# Altium PCB ESP32-Custom_Module.PcbDoc
Units mm, origin at the board's own origin, x right, y up, seen from the top; angles counter-clockwise.
Board outline 49.53 x 47.37 mm, 2 copper layers (Top Layer, Bottom Layer); 22 components, 37 nets, 127 pads, 12 vias.
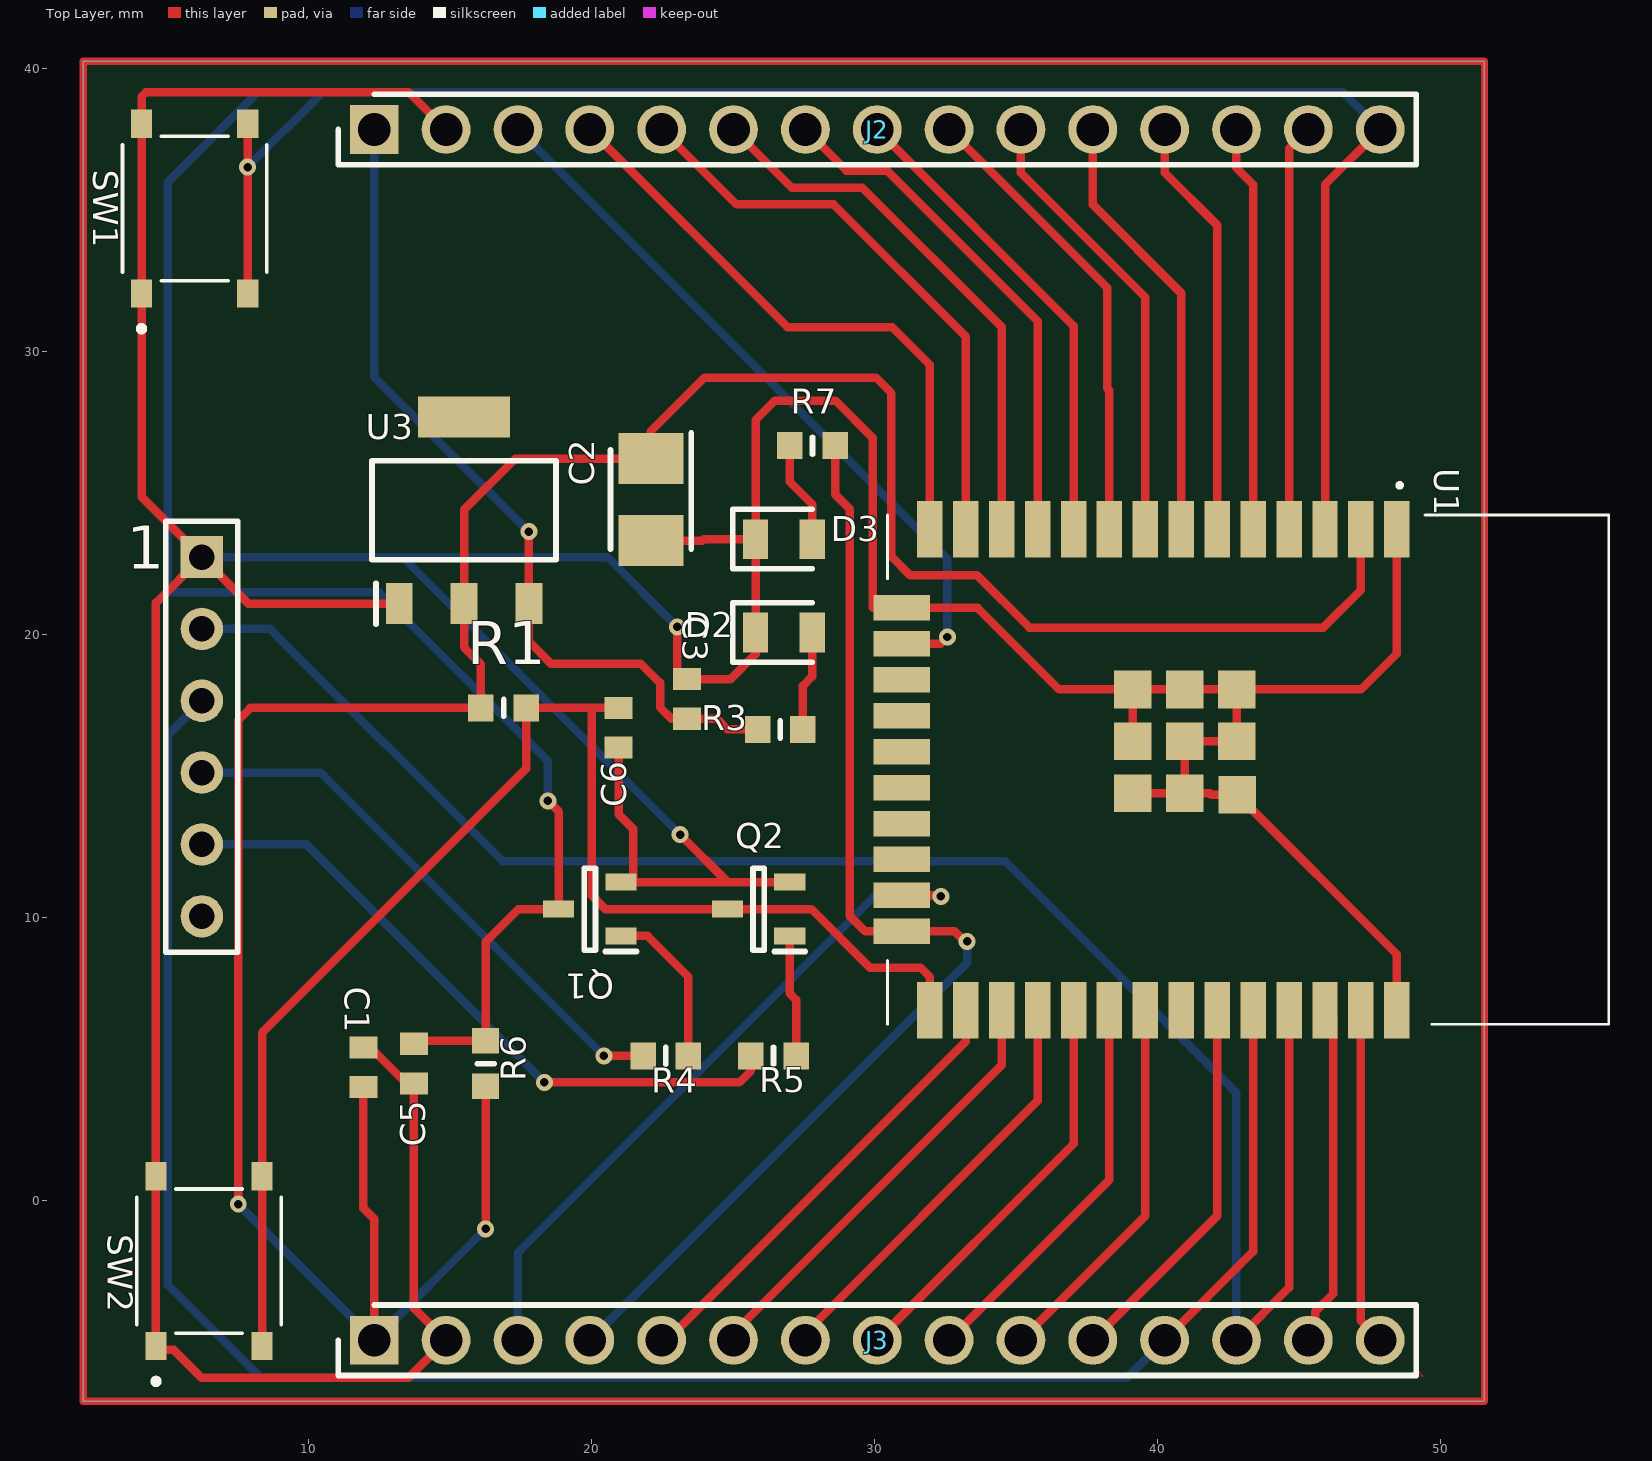
[diagram p0: Top Layer view]
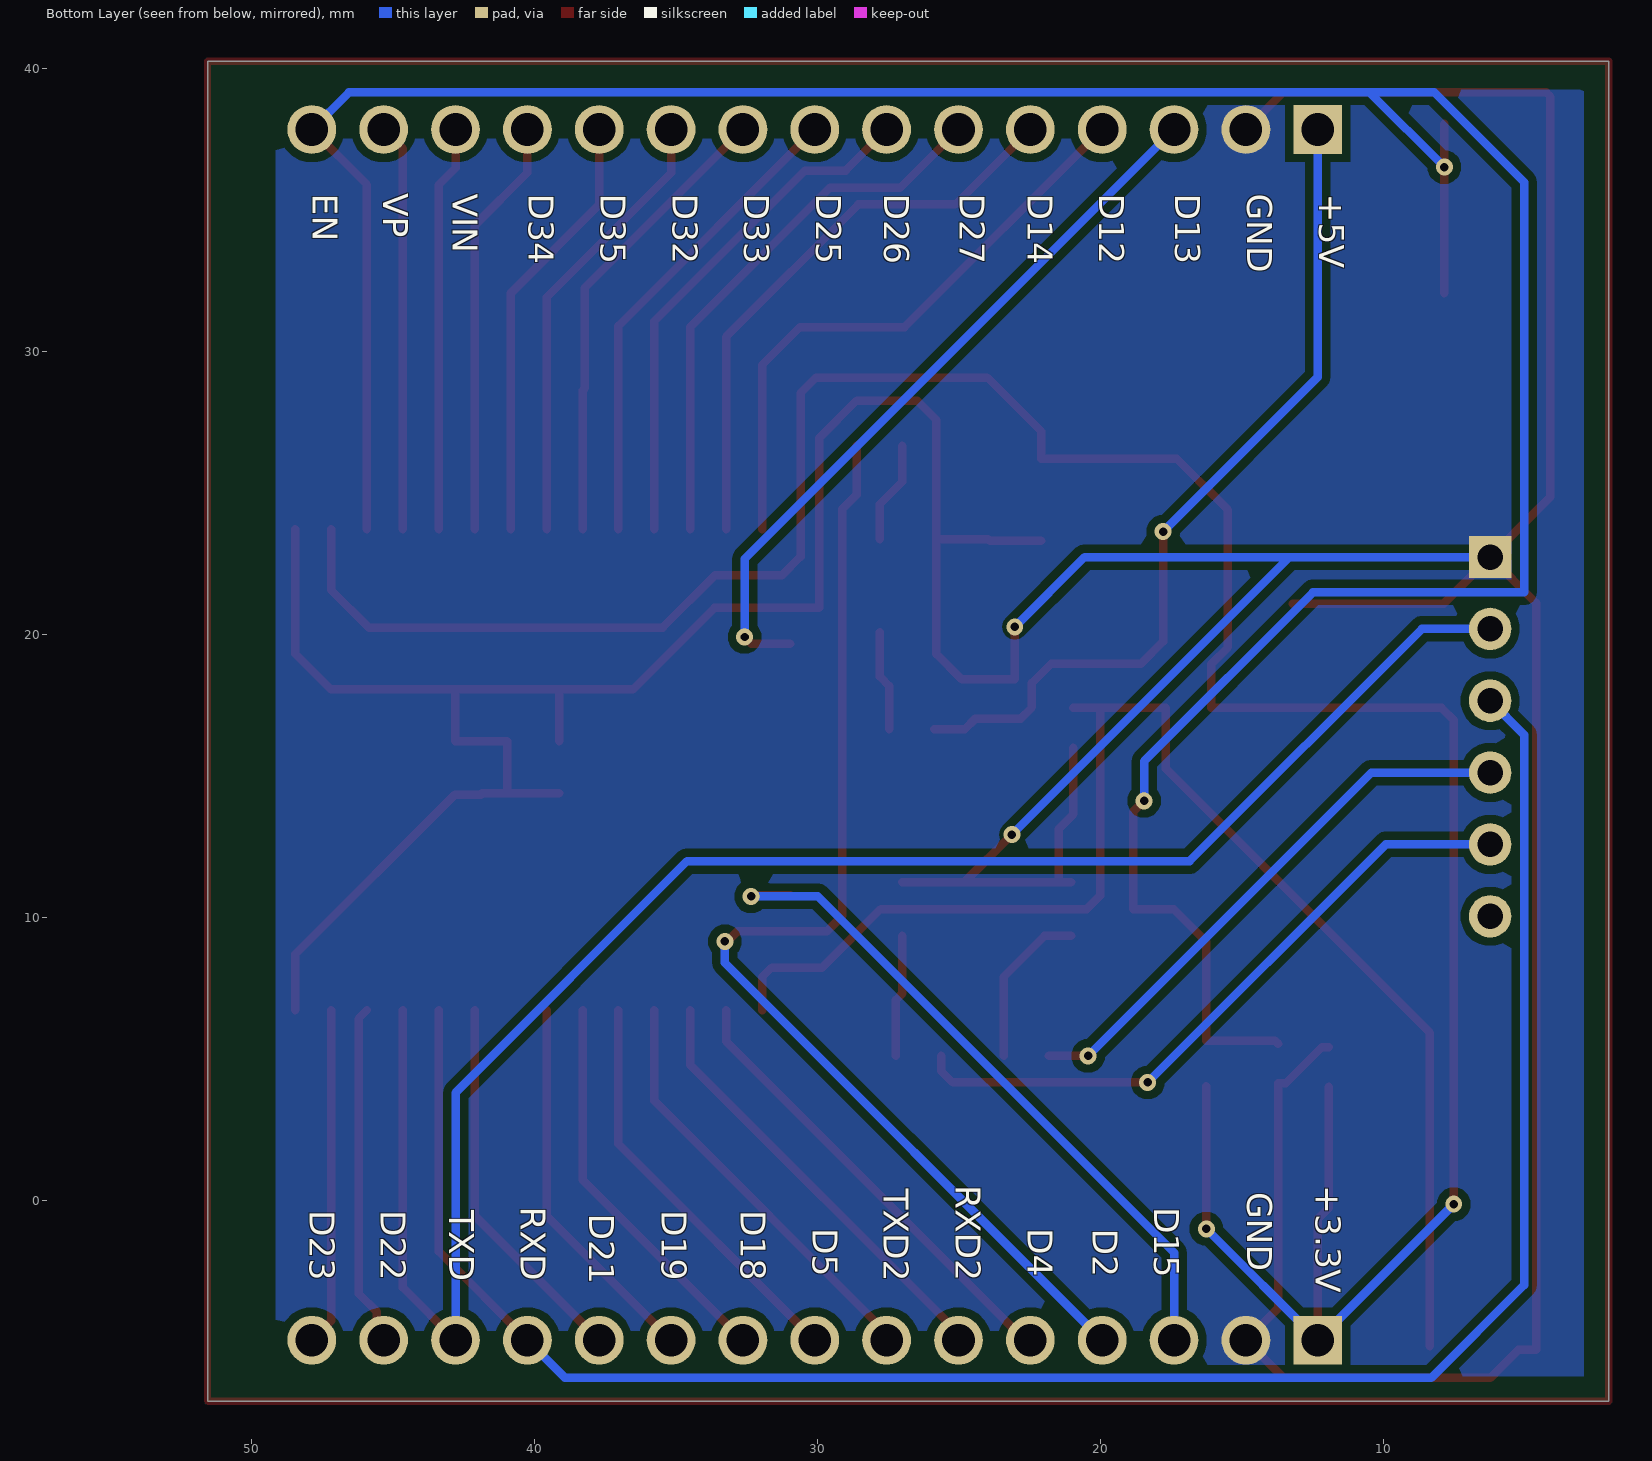
[diagram p1: Bottom Layer view, seen from below]
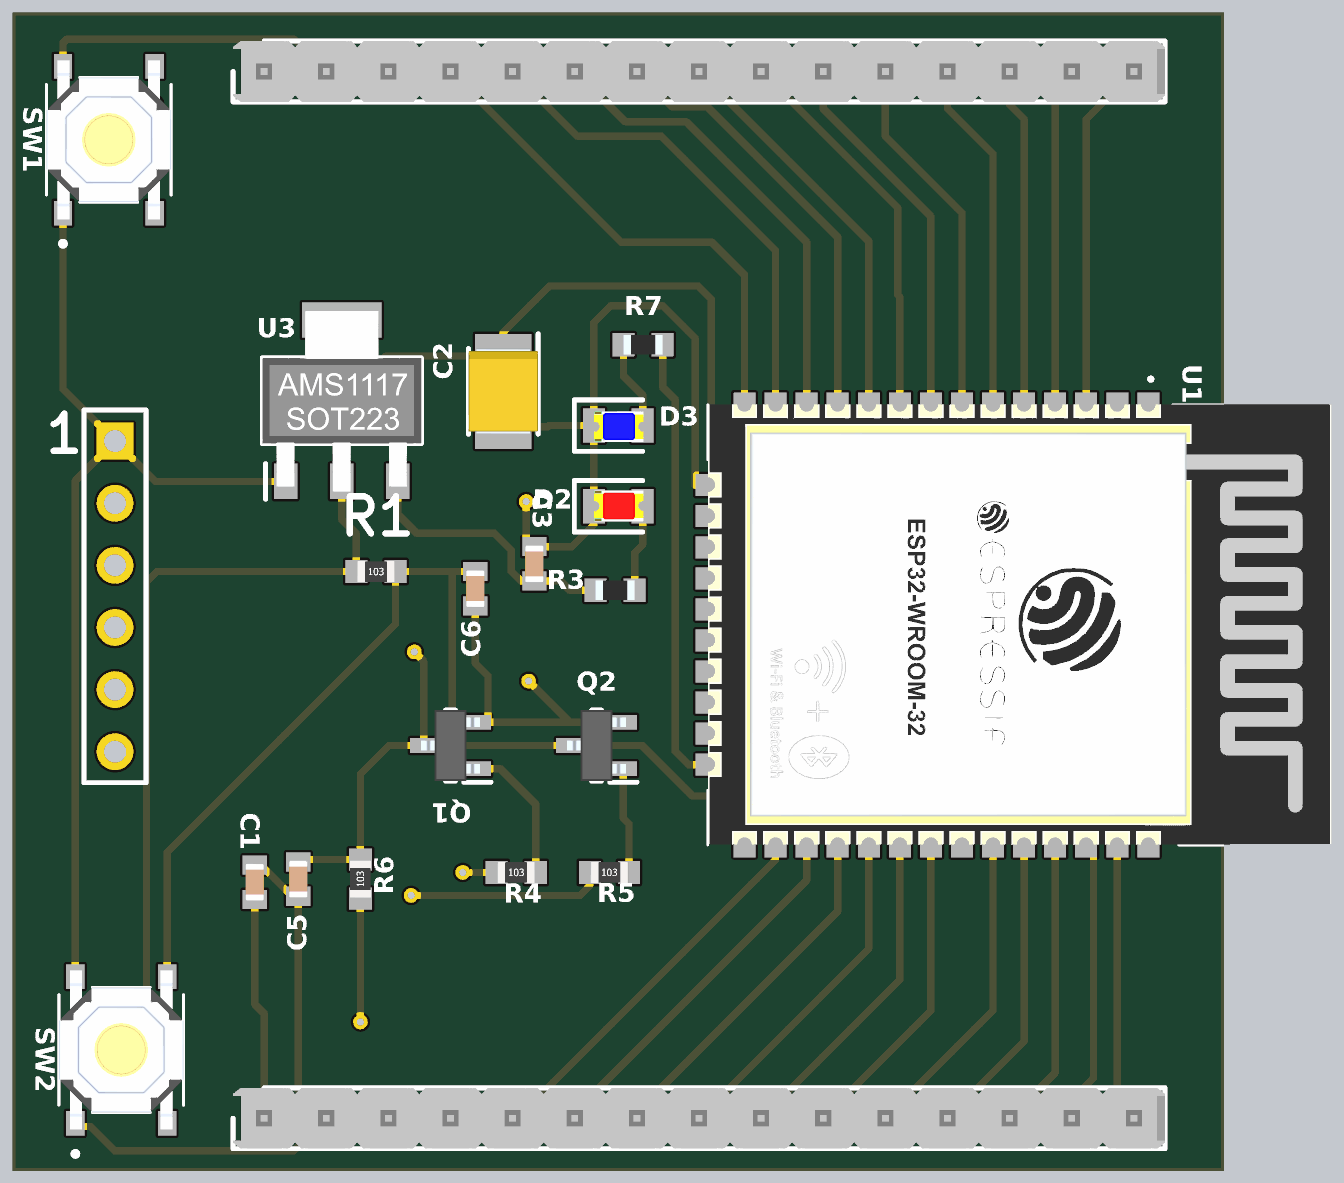
[diagram p2: 3D render of the assembled board from above, using the file's embedded part models]

## Layer stack, top to bottom
Top Solder: solder mask 0.0102, Solder Resist, Dk 3.5
Top Layer: signal copper 0.0356
Dielectric 1: dielectric 0.32, FR-4, Dk 4.8
Bottom Layer: signal copper 0.0356
Bottom Solder: solder mask 0.0102, Solder Resist, Dk 3.5

## Board outline
2.032,-7.112 2.032,40.259 51.562,40.259 51.562,-7.112

## Design rules (kind name [scope] priority, off if disabled: settings)
Clearance [All] p1: gap=0.3 ignorepadtopadclearanceinfootprint=FALSE
PolygonConnect [All] p1: connectstyle=Direct reliefconductorwidth=0.254 reliefentries=4 polygonreliefangle="90 Angle" airgapwidth=0.254
RoutingVias [All] p1: holewidth=0.3 width=0.6 viastyle="Through Hole" minholewidth=0.1 minwidth=0.3 maxholewidth=0.3 maxwidth=0.6
SolderMaskExpansion [All] p1: expansion=0.102 istentingtop=FALSE
SupplyNets "Schematic Supply Nets" [InNet('GND')] p1: voltage=0.000
Width [All] p1: maxlimit=0.5 minlimit=0.3 preferedwidth=0.3
30 further rules are at their usual default settings.

## Components (designator, comment, footprint, x,y, rotation, side; value= is the part's Value field where it differs from the comment)
1 "Header 6" HDR1X6 6.223,22.733 r270 top
C1 "100nf/0603" CAPC1608X90N 11.938,4.699 r90 top
C2 "10uf/16V/3528" CAPPM3528X210N 22.098,24.765 r270 top
C3 "100nf/0603" CAPC1608X90N 23.368,17.715 r90 top
C5 "100nf/0603" CAPC1608X90N 13.716,4.826 r90 top
C6 "100nf/0603" CAPC1608X90N 20.955,16.699 r90 top
D2 "Red" "LEDC2012X70N - duplicate" 26.797,20.066 r0 top
D3 "BLUE" LEDC2012X70N 26.797,23.368 r0 top
J2 "22-28-4150" HDRV15W66P0X254_1X15_3810X249X838P 12.319,37.846 r0 top
J3 "22-28-4150" HDRV15W66P0X254_1X15_3810X249X838P 12.319,-4.953 r0 top
Q1 "SS8050-G" SOT95P240X115-3N 19.939,10.287 r180 top
Q2 "SS8050-G" SOT95P240X115-3N 25.908,10.287 r180 top
R1 "10K/0603" RESC1608X55N 16.891,17.399 r0 top
R3 "1K/0603" RESC1608X55N 26.67,16.637 r0 top
R4 "10K/0603" RESC1608X55N 22.624,5.098 r0 top
R5 "10K/0603" RESC1608X55N 26.434,5.098 r0 top
R6 "10K/0603" RESC1608X55N 16.256,4.826 r90 top
R7 "220R/0603" RESC1608X55N 27.813,26.67 r180 top
SW1 "TS-1187A-B-A-B" SW_TS-1187A-B-A-B 5.969,35.052 r90 top
SW2 "TS-1187A-B-A-B" SW_TS-1187A-B-A-B 6.477,-2.159 r90 top
U1 "ESP32-WROOM-32__16MB_" ESP32WROOM3216MB 43.209,15.217 r270 top
U3 "Comment" SOT229P700X180-4N 15.494,24.384 r90 top

## Footprints (in the part's own frame and the unit in brackets; to place one, negate y for a bottom-side part, rotate by r counter-clockwise, add the part's x,y. Pads: shape width x height; smd on the part's side, far side on the other; paste and mask are expansions set on the pad)
CAPC1608X90N [mm]
  rect 0.78x0.99 smd: 1(-0.7,0) 2(0.7,0)
  body extent -0.76,-0.38 0.76,0.38, height 0.91
CAPPM3528X210N [mm]
  rect 1.8x2.3 smd: 1(-1.45,0) 2(1.45,0)
  silkscreen extent -2.35,-1.42 1.75,1.43, body extent -1.75,-1.43 1.75,1.43, height 2.1
ESP32WROOM3216MB [mm]
  rect 2x0.9 smd: 1(-8.5,5.26) 2(-8.5,3.99) 3(-8.5,2.72) 4(-8.5,1.45) 5(-8.5,0.18) 6(-8.5,-1.09) 7(-8.5,-2.36) 8(-8.5,-3.63) 9(-8.5,-4.9) 10(-8.5,-6.17) 11(-8.5,-7.44) 12(-8.5,-8.71) 13(-8.5,-9.98) 14(-8.5,-11.25) 25(8.5,-11.25) 26(8.5,-9.98) 27(8.5,-8.71) 28(8.5,-7.44) 29(8.5,-6.17) 30(8.5,-4.9) 31(8.5,-3.63) 32(8.5,-2.36) 33(8.5,-1.09) 34(8.5,0.18) 35(8.5,1.45) 36(8.5,2.72) 37(8.5,3.99) 38(8.5,5.26)
  rect 0.9x2 smd: 15(-5.715,-12.25) 16(-4.445,-12.25) 17(-3.175,-12.25) 18(-1.905,-12.25) 19(-0.635,-12.25) 20(0.635,-12.25) 21(1.905,-12.25) 22(3.175,-12.25) 23(4.445,-12.25) 24(5.715,-12.25)
  rect 1.33x1.33 smd: 39(-2.835,-0.405) 40(-1,-0.405) 41(0.889,-0.381) 42(-2.835,-2.24) 43(-1,-2.24) 44(0.835,-2.24) 45(-2.835,-4.075) 46(-1,-4.075) 47(0.835,-4.075)
  silkscreen extent -10.1,-12.75 9,12.75, body extent -9.02,-12.75 8.98,12.75, height 3.02
HDR1X6 [mm] "Connector; Header; 6 Position"
  rect 1.5x1.5 hole 0.9: 1(0,0)
  round 1.5 hole 0.9: 2(2.54,0) 3(5.08,0) 4(7.62,0) 5(10.16,0) 6(12.7,0)
  silkscreen extent -1.27,-1.27 13.97,1.27
HDRV15W66P0X254_1X15_3810X249X838P [mm]
  rect 1.725x1.725 hole 1.15: 1(0,0)
  round 1.725 hole 1.15: 2(2.54,0) 3(5.08,0) 4(7.62,0) 5(10.16,0) 6(12.7,0) 7(15.24,0) 8(17.78,0) 9(20.32,0) 10(22.86,0) 11(25.4,0) 12(27.94,0) 13(30.48,0) 14(33.02,0) 15(35.56,0)
  silkscreen extent -1.27,-1.24 36.83,1.25, body extent -1.27,-1.24 36.83,1.24, height 8.48
LEDC2012X70N [mm]
  rect 0.9x1.4 smd: 1(-1,0) 2(1,0)
  silkscreen extent -1.8,-1.05 1,1.05, body extent -0.98,-0.67 1.04,0.58, height 1.1
"LEDC2012X70N - duplicate" [mm]
  rect 0.9x1.4 smd: 1(-1,0) 2(1,0)
  silkscreen extent -1.8,-1.05 1,1.05, body extent -0.98,-0.61 1.04,0.64, height 1.1
RESC1608X55N [mm]
  rect 0.9x0.95 smd: 1(-0.8,0) 2(0.8,0)
  silkscreen extent 0,-0.3 0,0.3, body extent -0.77,-0.43 0.77,0.43, height 0.48
SOT95P240X115-3N [mm]
  rect 1.1x0.6 smd: 1(-1.1,0.95) 2(-1.1,-0.95) 3(1.1,0)
  silkscreen extent -1.65,-1.45 0.2,1.5, body extent -1.2,-1.45 1.2,1.45, height 1.15
SOT229P700X180-4N [mm]
  rect 1.45x0.95 smd: 1(-3.3,2.29) 2(-3.3,0) 3(-3.3,-2.29)
  rect 1.45x3.25 smd: 4(3.3,0)
  silkscreen extent -4.02,-3.25 1.75,3.25, body extent -3.71,-3.25 3.66,3.25, height 2
SW_TS-1187A-B-A-B [mm]
  rect 1x0.75 smd: A(-3,1.875) B(3,1.875) C(-3,-1.875) D(3,-1.875)
  silkscreen extent -4.35,-2.55 2.55,2.55, body extent -3.25,-2.55 3.25,2.55, height 1.55

## Part data
1: "Header, 6-Pin", LatestRevisionDate=17-Jul-2002, LatestRevisionNote="Re-released for DXP Platform.", Publisher="Altium Limited"
C1 C3 C5 C6: library part C0603C105K4RACTU7042, "Capacitor", Manufacturer_Name="Yageo Group", Arrow Part Number=C0603C105K4RACTU7042, Arrow Price/Stock=https://www.arrow.com/en/products/c0603c105k4ractu7042/kemet-corporation, Datasheet Link=https://www.arrow.com/en/products/c0603c105k4ractu7042/kemet-corporation, Height=0.9mm, Manufacturer_Part_Number=C0603C105K4RACTU7042
C2: library part TAJB475K025RNJ, "Capacitor Polarised", Manufacturer_Name="Kyocera AVX", Mouser Part Number=581-TAJB475K025R, Arrow Part Number=TAJB475K025RNJ, Arrow Price/Stock=https://www.arrow.com/en/products/tajb475k025rnj/avx, Datasheet Link=http://datasheets.avx.com/TAJ.pdf, Height=2.1mm, Manufacturer_Part_Number=TAJB475K025RNJ, Mouser Price/Stock=https://www.mouser.co.uk/ProductDetail/AVX/TAJB475K025RNJ?qs=mgX5NEyWO4Sl7CIvkz4Jiw%3D%3D
D2: library part 597-3305-607F, "LED", Manufacturer_Name=Dialight, Mouser Part Number=645-597-3305-607F, Arrow Part Number=597-3305-607F, Arrow Price/Stock=https://www.arrow.com/en/products/597-3305-607f/dialight?region=nac, Datasheet Link=https://s3-us-west-2.amazonaws.com/catsy.557/C18794.pdf, Height=0.7mm, Manufacturer_Part_Number=597-3305-607F, Mouser Price/Stock=https://www.mouser.co.uk/ProductDetail/Dialight/597-3305-607F?qs=BcvNGmdp0KXCFSNjF8jswA%3D%3D
D3: library part 597-3305-607F_1, "LED", Arrow Part Number=597-3305-607F, Manufacturer_Name=Dialight, Mouser Part Number=645-597-3305-607F, Arrow Price/Stock=https://www.arrow.com/en/products/597-3305-607f/dialight?region=nac, Datasheet Link=https://s3-us-west-2.amazonaws.com/catsy.557/C18794.pdf, Height=0.7mm, Manufacturer_Part_Number=597-3305-607F, Mouser Price/Stock=https://www.mouser.co.uk/ProductDetail/Dialight/597-3305-607F?qs=BcvNGmdp0KXCFSNjF8jswA%3D%3D
J2 J3: "Connector", Manufacturer_Name=Molex, Mouser Part Number=538-22-28-4150, Datasheet Link=https://componentsearchengine.com/Datasheets/1/22-28-4150.pdf, Height=8.38mm, Manufacturer_Part_Number=22-28-4150, Mouser Price/Stock=https://www.mouser.co.uk/ProductDetail/Molex/22-28-4150?qs=M5Ic86%252BuP8aClMFgmZrq7g%3D%3D
Q1 Q2: "Transistor BJT NPN", Manufacturer_Name="Comchip Technology", Mouser Part Number=750-SS8050-G, Arrow Part Number=SS8050-G, Arrow Price/Stock=https://www.arrow.com/en/products/ss8050-g/comchip-technology?region=nac, Datasheet Link=https://datasheet.datasheetarchive.com/originals/distributors/DKDS-12/229454.pdf, Height=1.15mm, Manufacturer_Part_Number=SS8050-G, Mouser Price/Stock=https://www.mouser.co.uk/ProductDetail/Comchip-Technology/SS8050-G?qs=LLUE9lz1YbcHg%252BWLMAtcrQ%3D%3D
R1 R3 R4 R5 R6 R7: library part CRGCQ0603J10K, "Resistor", Manufacturer_Name="TE Connectivity", Mouser Part Number=279-CRGCQ0603J10K, Datasheet Link=https://4donline.ihs.com/images/VipMasterIC/IC/TYEL/TYEL-S-A0004929575/TYEL-S-A0004929575-1.pdf?hkey=52A5661711E402568146F3353EA87419, Height=0.55mm, Manufacturer_Part_Number=CRGCQ0603J10K, Mouser Price/Stock=https://www.mouser.co.uk/ProductDetail/TE-Connectivity-Holsworthy/CRGCQ0603J10K?qs=wUXugUrL1qzulhGjUR%2FJ4g%3D%3D
SW1 SW2: "SPST 50mA @ 12VDC Top Actuated Round Button 160gf SMD Tactile Switches RoHS", Package=None, Availability=Unavailable, MP=TS-1187A-B-A-B, Price=None
U1: "Integrated Circuit", Manufacturer_Name="Espressif Systems", Manufacturer_Part_Number="ESP32-WROOM-32 (16MB)", Mouser Part Number=356-ESPWROOM3216MB, Datasheet Link=https://www.espressif.com/sites/default/files/documentation/esp32_datasheet_en.pdf, Height=3.2mm, Mouser Price/Stock=https://www.mouser.co.uk/ProductDetail/Espressif-Systems/ESP32-WROOM-32-16MB?qs=w%2Fv1CP2dgqrcPyEPuQvO1A%3D%3D
U3: library part AMS1117-3.3, "Integrated Circuit", Manufacturer_Name=Advanced, Datasheet Link=https://datasheet.datasheetarchive.com/originals/distributors/Datasheets-28/DSA-550594.pdf, Height=1.8mm, Manufacturer_Part_Number=AMS1117-3.3

## Via types
v1: diameter 0.6, hole 0.3, Top Layer to Bottom Layer, 12 vias

## Nets (pads, with @x,y where several pads share a name; then routed paths per layer and width w, separated by ;. In a path a pad name is that pad's centre, name@x,y a point inside that pad or via, vN(x,y) a via of type N, cw(c..) or ccw(c..) an arc to the next point about the centre after c; other vN are vias at no path point)
+3.3V: C1.1 C2.1 J3.1 R1.1 R6.1 U1.2 U3.2 | length 103.6
  Top Layer w0.3: v1(7.511,-0.145) 7.511,16.967 7.943,17.399 R1.1 16.091,18.941 15.494,19.538 U3.2 15.494,24.402 17.307,26.215 C2.1@22.091,26.215 ; C1.1 11.938,-0.287 12.319,-0.668 J3.1 ; v1(16.256,-1.016) R6.1 ; C2.1 C2.1@22.091,26.215 ; U1.2 47.199,21.57 45.865,20.236 35.476,20.236 33.622,22.091 31.26,22.091 30.6,22.751 30.6,28.53 30.054,29.076 23.996,29.076 22.091,27.171 C2.1@22.091,26.215
  Bottom Layer w0.3: v1(7.511,-0.145) J3.1 v1(16.256,-1.016)
+5V: C3.1 J2.1 R3.1 U3.3 | length 30.2
  Top Layer w0.3: v1(17.784,23.629) U3.3 17.784,19.742 18.56,18.966 21.735,18.966 22.421,18.281 22.421,17.417 22.823,17.015 C3.1 24.427,17.015 24.805,16.637 R3.1
  Bottom Layer w0.3: J2.1 12.319,29.094 v1(17.784,23.629)
D2: J3.4 R7.1 U1.24 | length 41
  Top Layer w0.3: R7.1 28.613,24.941 29.126,24.427 29.126,10.048 29.673,9.502 32.835,9.502 33.193,9.144 v1(33.274,9.144)
  Bottom Layer w0.3: J3.4 33.274,8.382 v1(33.274,9.144)
D4: J3.5 U1.26 | length 16.2
  Top Layer w0.3: J3.5 22.67,-4.953 33.229,5.607 U1.26
D5: J3.8 U1.29 | length 14.5
  Top Layer w0.3: J3.8 37.039,1.987 U1.29
D12: J2.4 U1.14 | length 21.3
  Top Layer w0.3: J2.4 26.926,30.859 30.625,30.859 31.959,29.525 U1.14
D13: J2.3 U1.16 | length 26
  Top Layer w0.3: U1.16 32.337,19.662 v1(32.581,19.906)
  Bottom Layer w0.3: J2.3 32.581,22.664 v1(32.581,19.906)
D14: J2.5 U1.13 | length 20.6
  Top Layer w0.3: J2.5 25.129,35.196 28.56,35.196 33.229,30.526 U1.13
D15: J3.3 U1.23 | length 24.7
  Top Layer w0.3: U1.23 32.317,10.772 v1(32.352,10.737)
  Bottom Layer w0.3: J3.3 17.399,-1.854 29.99,10.737 v1(32.352,10.737)
D18: J3.9 U1.30 | length 14
  Top Layer w0.3: J3.9 38.309,0.717 U1.30
D19: J3.10 U1.31 | length 13.5
  Top Layer w0.3: J3.10 39.579,-0.553 U1.31
D21: J3.11 U1.33 | length 13.5
  Top Layer w0.3: J3.11 42.119,-0.553 U1.33
D22: J3.14 U1.36 | length 12.2
  Top Layer w0.3: J3.14 45.586,-4.706 45.586,-3.944 46.228,-3.302 46.228,6.418 U1.36
D23: J3.15 U1.37 | length 12
  Top Layer w0.3: U1.37 47.199,-4.273 J3.15
D25: J2.8 U1.10 | length 17
  Top Layer w0.3: J2.8 37.039,30.906 U1.10
D26: J2.7 U1.11 | length 18.4
  Top Layer w0.3: J2.7 29.009,36.396 30.448,36.396 35.769,31.075 U1.11
D27: J2.6 U1.12 | length 19.5
  Top Layer w0.3: J2.6 27.069,35.796 29.563,35.796 34.499,30.86 U1.12
D32: J2.10 U1.8 | length 16
  Top Layer w0.3: J2.10 35.179,36.312 39.579,31.912 U1.8
D33: J2.9 U1.9 | length 16.5
  Top Layer w0.3: J2.9 38.227,32.258 38.227,28.702 38.309,28.62 U1.9
D34: J2.12 U1.6 | length 14.9
  Top Layer w0.3: J2.12 40.259,36.322 42.119,34.462 U1.6
D35: J2.11 U1.7 | length 15.4
  Top Layer w0.3: J2.11 37.719,35.19 40.849,32.06 U1.7
DTR: 1.4 R4.1 | length 19.7
  Top Layer w0.3: v1(20.44,5.098) R4.1
  Bottom Layer w0.3: 1.4 10.425,15.113 v1(20.44,5.098)
EN: C5.2 J2.15 Q1.3 R6.2 SW1.C SW1.D U1.3 | length 114.3
  Top Layer w0.3: SW1.C v1(7.844,36.518) SW1.D ; C5.2 13.816,5.626 R6.2 16.256,9.126 17.417,10.287 Q1.3 18.839,13.735 v1(18.458,14.115) ; U1.3 45.929,35.896 J2.15
  Bottom Layer w0.3: v1(7.844,36.518) 10.486,39.159 ; v1(18.458,14.115) 18.458,15.512 12.489,21.481 5.022,21.481 5.022,35.984 8.197,39.159 10.486,39.159 ; J2.15 46.566,39.159 10.486,39.159
GND: 1.1 C1.2 C2.2 C3.2 C5.1 C6.1 D2.1 D3.1 J2.2 J3.2 Q1.2 Q2.2 SW1.A SW1.B SW2.A SW2.B U1.1 U1.15 U1.38 U1.39 U1.40 U1.41 U1.42 U1.43 U1.44 U1.45 U1.46 U1.47 U3.1 | length 206.6
  Top Layer w0.3: C1.2 12.185,5.399 13.458,4.126 C5.1 13.716,-3.81 J3.2 13.531,-6.281 6.216,-6.281 5.225,-5.291 4.602,-5.291 SW2.A SW2.B 4.602,21.112 1.1 ; U3.1 7.872,21.084 1.1 ; J2.2 13.546,39.159 4.246,39.159 4.094,39.007 SW1.B SW1.A 4.094,24.862 1.1 ; C6.1 20.955,13.64 21.474,13.121 Q1.2@21.474,11.237 ; Q1.2 Q1.2@21.474,11.237 ; C2.2 23.919,23.315 23.972,23.368 D3.1 ; v1(23.03,20.262) 23.03,18.415 C3.2 24.91,18.415 25.797,19.302 D2.1 25.797,21.71 D3.1 ; v1(23.132,12.921) 24.816,11.237 ; Q2.2 24.816,11.237 ; U1.47 U1.44 ; U1.46 U1.45 ; U1.38 48.469,8.687 U1.41 41.906,14.328 41.852,14.382 U1.44 ; U1.1 48.469,19.322 47.199,18.052 U1.39 ; Q1.2@21.474,11.237 24.816,11.237 ; D3.1 25.797,27.577 26.483,28.263 28.618,28.263 29.939,26.942 29.939,20.932 U1.15 33.648,20.932 36.528,18.052 U1.45 ; U1.45 U1.42 U1.39 ; U1.44 U1.43 U1.40 U1.39
  Bottom Layer w0.3: 1.1 13.32,22.733 ; v1(23.03,20.262) 20.559,22.733 13.32,22.733 ; v1(23.132,12.921) 13.32,22.733
IO0: C6.2 Q2.3 R1.2 SW2.C SW2.D U1.25 | length 50.6
  Top Layer w0.3: SW2.C SW2.D 8.352,5.916 17.691,15.255 R1.2 20.008,17.399 ; C6.2 20.008,17.399 ; U1.25 31.959,7.892 31.629,8.222 29.838,8.222 27.773,10.287 Q2.3 20.483,10.287 20.008,10.762 20.008,17.399
NC: 1.6
NetD2_2: D2.2 R3.2 | length 3.6
  Top Layer w0.3: R3.2 27.47,18.179 27.797,18.506 D2.2
NetD3_2: D3.2 R7.2 | length 3.6
  Top Layer w0.3: R7.2 27.013,25.389 27.797,24.605 D3.2
NetQ1_1: Q1.1 R4.2 | length 5.8
  Top Layer w0.3: Q1.1 21.979,9.337 23.424,7.892 R4.2
NetQ2_1: Q2.1 R5.2 | length 4.3
  Top Layer w0.3: Q2.1 27.008,7.305 27.234,7.079 R5.2
RTS: 1.5 R5.1 | length 23.6
  Top Layer w0.3: v1(18.331,4.158) 25.228,4.158 25.634,4.565 R5.1
  Bottom Layer w0.3: 1.5 9.917,12.573 v1(18.331,4.158)
RXD: 1.3 J3.12 U1.34 | length 71.3
  Top Layer w0.3: J3.12 43.389,-1.823 U1.34
  Bottom Layer w0.3: 1.3 5.022,16.452 5.022,-3.005 8.298,-6.281 38.931,-6.281 J3.12
RXD2: J3.6 U1.27 | length 15.6
  Top Layer w0.3: J3.6 25.019,-4.699 34.499,4.781 U1.27
TXD: 1.2 J3.13 U1.35 | length 64.6
  Top Layer w0.3: J3.13 44.659,-3.093 U1.35
  Bottom Layer w0.3: 1.2 8.636,20.193 16.848,11.981 34.613,11.981 42.799,3.795 J3.13
TXD2: J3.7 U1.28 | length 15.1
  Top Layer w0.3: J3.7 27.559,-4.699 35.769,3.511 U1.28
VN: J2.13 U1.5 | length 14.4
  Top Layer w0.3: J2.13 42.799,36.486 43.389,35.896 U1.5
VP: J2.14 U1.4 | length 14.4
  Top Layer w0.3: U1.4 44.659,37.166 J2.14
pads on no net: U1.17 U1.18 U1.19 U1.20 U1.21 U1.22 U1.32 U3.4
copper on no net: | length 193.8
  Top Layer w0.254: 2.032,-7.112 51.562,-7.112 51.562,40.259 2.032,40.259 2.032,-7.112

## Polygon pours and split planes (outlines as drawn)
GND on Bottom Layer "GND_L02_P000" (solid, pour order 0): 2.921,39.37 3.048,39.243 49.149,39.243 49.149,-5.969 49.403,-6.223 2.921,-6.223
no net on Top Layer "NONET_L01_P001" (solid, pour order 1): 49.022,-6.223 49.149,-6.223 48.895,-6.223 49.149,-5.969 49.403,-6.223 49.022,-6.223 49.149,-6.096 49.276,-6.096

## Silkscreen, mask and mechanical layers (free items; w line width, h text height)
Bottom Overlay:
  text "VP" at 45.657,35.596 h1.52 r90
  text "+5V" at 12.569,35.578 h1.52 r90
  text "GND" at 15.109,35.578 h1.52 r90
  text "D13" at 17.649,35.578 h1.52 r90
  text "D12" at 20.338,35.578 h1.52 r90
  text "D14" at 22.878,35.578 h1.52 r90
  text "D27" at 25.269,35.578 h1.52 r90
  text "D26" at 27.936,35.578 h1.52 r90
  text "D25" at 30.349,35.578 h1.52 r90
  text "D33" at 32.889,35.578 h1.52 r90
  text "D32" at 35.429,35.578 h1.52 r90
  text "D35" at 37.969,35.578 h1.52 r90
  text "D34" at 40.509,35.578 h1.52 r90
  text "VIN" at 43.198,35.578 h1.52 r90
  text "EN" at 48.151,35.578 h1.52 r90
  text "+3.3V" at 12.696,0.526 h1.52 r90
  text "RXD2" at 25.418,0.526 h1.52 r90
  text "TXD2" at 27.958,0.399 h1.52 r90
  text "GND" at 15.109,0.272 h1.52 r90
  text "RXD" at 40.785,-0.236 h1.52 r90
  text "D15" at 18.393,-0.254 h1.52 r90
  text "D18" at 33.016,-0.363 h1.52 r90
  text "D19" at 35.81,-0.363 h1.52 r90
  text "TXD" at 43.325,-0.363 h1.52 r90
  text "D22" at 45.738,-0.363 h1.52 r90
  text "D23" at 48.256,-0.363 h1.52 r90
  text "D21" at 38.372,-0.49 h1.52 r90
  text "D4" at 22.878,-0.998 h1.52 r90
  text "D5" at 30.476,-0.998 h1.52 r90
  text "D2" at 20.574,-1.016 h1.52 r90
Mechanical 13:
  lines w0.2: 5.352,31.387 5.479,31.387 ; 20.293,-7.239 36.386,-7.239 ; 22.797,40.386 33.882,40.386